# Altium PCB PCB_GTV3.3.PcbDoc (part 10 of 11)
Units mil, origin at the board's own origin, x right, y up, seen from the top; angles counter-clockwise.
Board outline 8070.87 x 4881.89 mil, 4 copper layers (Top Layer, GND, PWR, Bottom Layer), stack 61.653 mil thick; 464 components, 293 nets, 1458 pads, 748 vias.
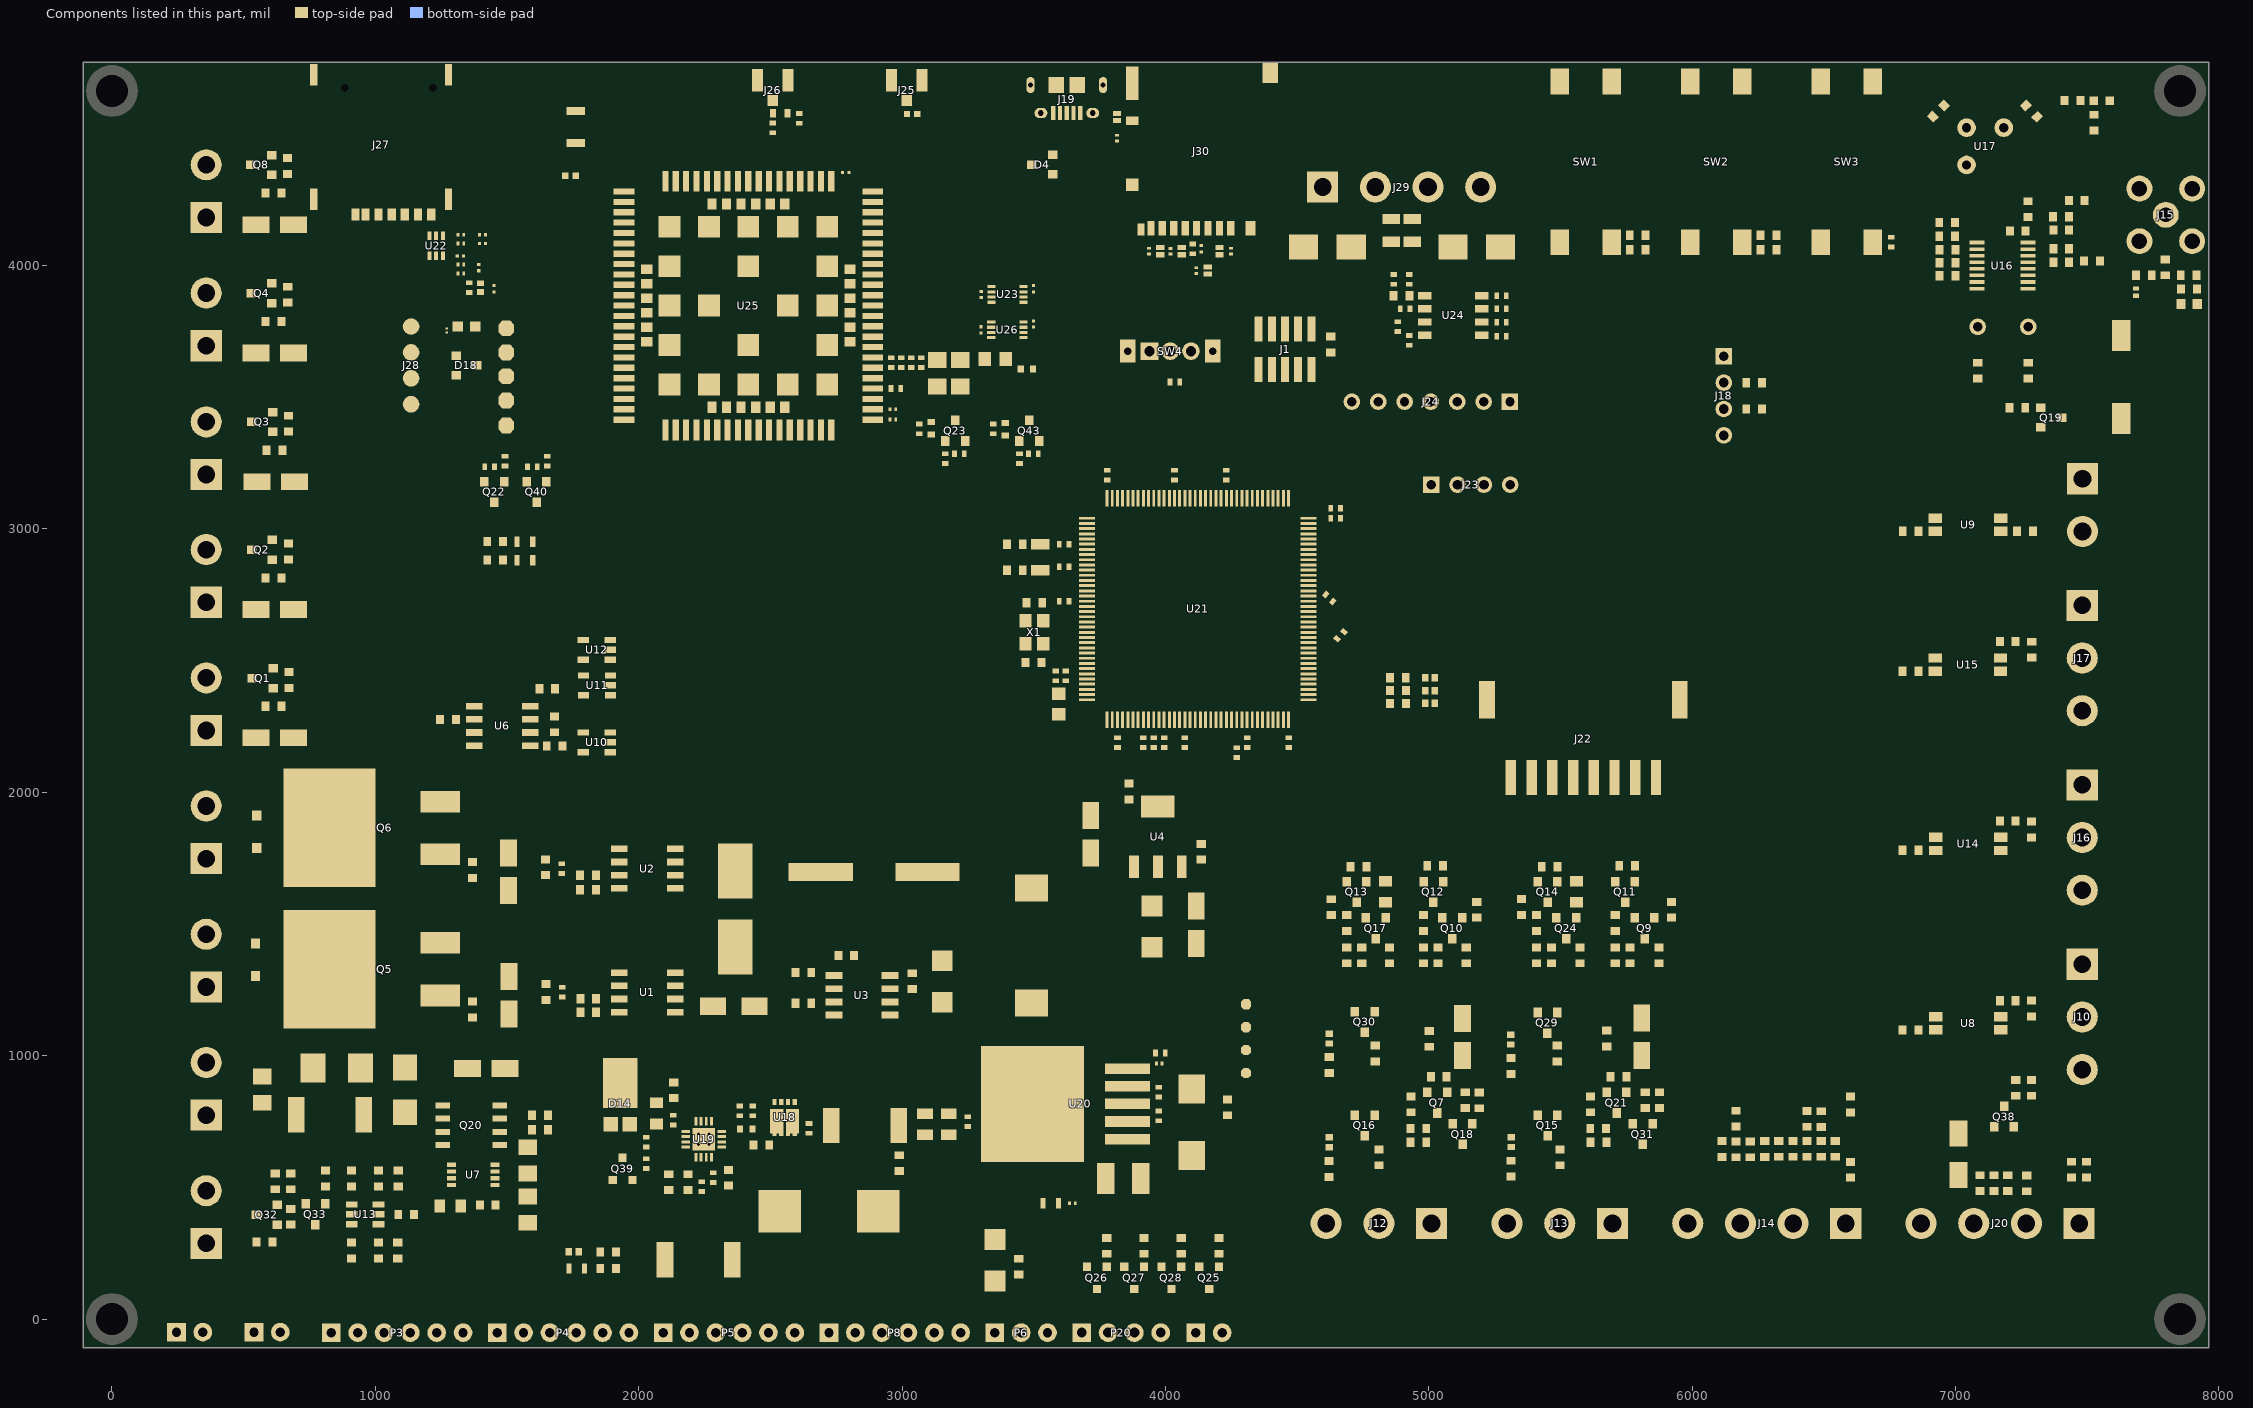
[diagram p7: the components of this part, seen from the top]

## Other copper
Top Layer:
  rectangle net VREF: 2215.07,506.67 2252.31,558.52
  rectangle net NetQ39_3: 2150.62,687.16 2193.89,698.18
  rectangle net GND: 2245.75,3806.7 2353.1,3821
  rectangle net SIM_CD: 1330.37,3962.75 1358.96,3977.32
  rectangle net SIM_RST: 1330.37,3996.75 1358.96,4011.32
  rectangle net SIM_CLK: 1330.42,4076.17 1359.01,4090.74
  rectangle net SIM_DATA: 1330.37,4109.84 1358.96,4124.41
  rectangle net GND: 752.09,4628 779.65,4765.95
  rectangle net GND: 3464.95,4639 3874.32,4718.13
  rectangle net GND: 3511.12,4654.86 3615.55,4715.88
  rectangle net GND: 1444.09,3917.91 1496.26,3929.64
  rectangle net GND: 1386.96,3937.97 1432.19,3986.32
  rectangle net GND: 1325.25,4030.94 1342.66,4056.12
  rectangle net GND: 1412.68,4042.75 1427.77,4159
  rectangle net GND: 2538.66,4475.29 2561.93,4517.87
  rectangle net GND: 2977.9,4543.19 2987.72,4585.98
  rectangle net GND: 3048.24,4543.19 3069.5,4575
  rectangle net NetC8_2: 2849.33,3639.37 2928.07,3741.74
  rectangle net GND: 2791.98,4343.66 2827,4545
  rectangle net GND: 4444.4,2161.5 4479.86,2179.5
  rectangle net GND: 5765.32,1504.03 5818.87,1541.04
  rectangle net GND: 3493.09,3917.91 3519,3949.38
  rectangle net GND: 3270.36,3761.91 3305.91,3819.42
  rectangle net VCC#12: 2213,1106 2336.8,1220.86
  rectangle net BAT: 2385.18,512.67 2435.75,630.07
  rectangle net BAT: 2373.31,475.67 2396.94,657.19
  rectangle net S_VIN: 1768.87,617.29 1900.5,767.23
  rectangle net VCC_M: 602.37,403.46 708.37,508.03
  rectangle net 5V: 7554,481 7691,612.4
  rectangle net NetLS1_2: 7384.13,3360.98 7664.3,3482.03
  rectangle net 3V3: 7384.13,3675.94 7664.3,3794.05
  rectangle net GSM_PWR: 3771,1089.97 4253.14,1215.68
  rectangle net GSM_PWR: 4030.87,819.24 4253.14,1215.68
  rectangle net 5V: 7479.48,582.4 7691,708
  rectangle net GSM_PWR: 3770.55,863.88 4150.32,904.03
  rectangle net RST_GSM: 3159.4,3379.76 3178.33,3422.25
  rectangle net GND: 3053.1,3346.83 3124.38,3370.26
  rectangle net GSM_PWR: 3290.88,3511.03 3458.65,3571.03
  rectangle net 3V3: 4268.44,2160.01 4322.38,2179.5
  rectangle net 3V3: 3545,1860.11 4035.25,1988
  rectangle net GND: 3512,2625.02 3605.86,2738.06
  rectangle net 3V3: 3494,2258.65 3623.45,2322.41
  rectangle net VDDA: 3567.02,2350.75 3618.98,2432.88
  rectangle net 3V3: 3461.3,3895.29 3499.41,3904.63
  rectangle net 3V3: 4916.87,1396.03 4997.37,1489.03
  rectangle net GND: 5595.67,1080.03 5839.86,1194.08
  rectangle net GND: 4915.17,1079.03 5159.36,1193.08
  rectangle net 3V3: 5646.65,1396.03 5725.37,1489.03
  rectangle net 3V3: 4578.87,1579.03 4647.37,1638.1
  rectangle net 3V3: 5284.87,1569.32 5369.37,1636.92
  rectangle net 3V3: 4538.91,3712.33 4645.42,3806.82
  rectangle net 3V3: 4872.81,3823.76 4900.53,3847.17
  region net VDD_EXT: 3461.3,3885.13 3420.51,3885.13 3420.51,3875.8 3461.3,3875.8
  region net VDD_EXT: 3460.89,3750.96 3420.1,3750.96 3420.1,3741.62 3460.89,3741.62
  rectangle net VDD_EXT: 2849.33,3481.2 3004.37,3506.2
  rectangle net GND: 2225.32,4105.91 2756.81,4188.59
  rectangle net 3V3: 3313.61,105.29 3577.17,184.03
  rectangle net GND: 4368.15,4627 4427.21,4718.48
  rectangle net 5V: 2974.49,1662.95 3305,1731.85
  rectangle net 5V: 3427.99,1517.59 4154.18,1636.9
  rectangle net 5V: 4043.13,1517.59 4154.18,1759.72
  rectangle net _ADC: 3903.67,2198.5 4007.41,2216.5
  rectangle net GND: 1171.52,1323.99 1321.52,1469.5
  rectangle net GND: 1171.52,1860 1321.52,2005.51
  rectangle net GND: 1410,1718.19 1958.4,1820.55
  rectangle net 5V: 1476.46,1089 1960.8,1127.76
  rectangle net 5V: 1474.5,1558 1958.85,1596.76
  rectangle net 5V: 1823.5,1089 1960.8,1183.08
  rectangle net 5V: 1822.5,1558 1958.4,1648.08
  rectangle net 5V: 1695.8,2140.64 1811.76,2193.71
  rectangle net 5V: 1430,2214.41 1483.69,2340
  rectangle net 5V: 1305.87,2264.41 1449,2290
  region net VCC: 6618.37,598.66 6618.37,646.4 6583.37,646.4 6583.37,598.66
  region net GND: 5984.03,2122.96 5764.18,2122.96 5764.18,1989.11 5984.03,1989.11
  rectangle net VCC: 5190,1989.11 5409.85,2122.96
  rectangle net VCC: 5595.67,830.31 5704.87,1050.03
  rectangle net VCC: 5595.67,949.99 5839.86,1052.35
  rectangle net VCC: 4915.17,948.99 5159.36,1051.35
  rectangle net VCC: 4915.17,830.31 5022.64,1049.03
  rectangle net VCC: 1565,810.77 1669.87,982.89
  rectangle net VCC: 1639.87,756.53 1669.87,982.89
  rectangle net VCC: 2108.01,1722.49 2260,1987.82
  rectangle net VCC: 2108.01,1253.49 2260,1517.82
  rectangle net GND: 1639.87,668.22 1669.87,736.53
  rectangle net VCC: 510,2234.57 598.32,2344.5
  rectangle net VCC: 510,2721.6 598.32,2831.53
  rectangle net VCC: 514,3206.6 602.32,3316.53
  rectangle net VCC: 510,3695.57 598.32,3805.5
  rectangle net VCC: 510,4182.57 598.32,4292.5
  rectangle net VCC: 7212.84,1192.2 7305.73,1406.12
  rectangle net VCC: 7212.84,1288.01 7540.03,1406.12
  rectangle net VCC: 7212.84,2554.87 7306.94,2768.78
  rectangle net VCC: 7212.84,2650.67 7540.03,2768.78
  rectangle net VCC: 7212.84,1969.34 7540.03,2087.45
  rectangle net VCC: 7212.84,1873.53 7305.73,2087.45
  region net NetD8_2: 5090.04,4109.92 4904.07,4109.92 4904.07,4070.55 5090.04,4070.55
  rectangle net NetD5_2: 4705.42,4070.55 4891.39,4109.92
  rectangle net NetR87_1: 4919.53,3821.73 5010.21,3849.29
  rectangle net NetR61_1: 4832.21,3771.73 4851,3938.03
  rectangle net NetR87_1: 4919.53,3823.01 4937.53,3885.51
  rectangle net NetR87_1: 4911.03,3868.01 4941.03,3938.03
  rectangle net NetR61_1: 4836,3868.01 4881.03,3938.03
  rectangle net NRST: 6649.97,4039.22 6768.37,4079.53
  rectangle net GND: 3512,2625.02 3559.24,2737.16
  rectangle net XIN: 3445.07,2625.02 3492.32,2737.16
  region net 3V3: 4606.26,2735.9 4623.94,2753.58 4610.3,2767.22 4592.63,2749.54
  region net 3V3: 4659.78,2573.84 4642.11,2591.51 4628.47,2577.88 4646.15,2560.2
  rectangle net RS_CNTRL: 576.94,4334.19 606,4357.81
  rectangle net PM_CNTRL: 577.94,3846.19 607,3869.81
  rectangle net MEM_CNTRL: 580.94,3356.19 610,3379.81
  rectangle net FLUSH_CNTRL: 579.94,2869.19 609,2892.81
  rectangle net FILL_CNTRL: 583,2383.63 612.06,2407.25
  rectangle net FILL_CNTRL: 593.95,2379.3 690.19,2411.36
  rectangle net GND: 7235.87,3980.64 7303.85,3994.42
  rectangle net GND: 7235.87,3930.64 7303.85,3944.42
  rectangle net 3V3: 7207.64,893.03 7305.73,923.03
  rectangle net VCC: 298.86,4123.51 598.32,4241.62
  rectangle net VCC: 298.86,3636.51 598.32,3754.62
  rectangle net VCC: 302.86,3147.51 602.32,3265.62
  rectangle net VCC: 298.86,2662.51 598.32,2780.62
  rectangle net VCC: 298.86,2175.51 598.32,2293.62
  rectangle net GND: 632,3147.58 775,3316.5
  rectangle net GND: 628,4123.58 833,4292.5
  rectangle net GND: 628,3636.58 774,3805.5
  rectangle net GND: 628,2662.58 740.05,2831.53
  rectangle net GND: 628,2175.58 740.05,2344.5
  rectangle net AUTO_FILL: 363.74,2399.81 551.43,2466.81
  rectangle net AUTO_FLUSH: 360.74,2887.57 548.43,2954.57
  rectangle net MEM_SAVER: 361.92,3373 549.61,3440
  rectangle net PROP_MIXING: 358.92,3862 546.61,3929
  rectangle net RESIN_SAVER: 357.92,4349 545.61,4416
  rectangle net GNSS_PWRCTRL: 3624.86,2842.88 3660.15,2868.87
  region net 3V3: 4225.23,3193.64 4225.23,3163.89 4237.04,3163.89 4237.04,3193.64
  region net 3V3: 4028.38,3193.64 4028.38,3163.89 4040.19,3163.89 4040.19,3193.64
  region net 3V3: 3772.47,3193.64 3772.47,3163.89 3784.28,3163.89 3784.28,3193.64
  rectangle net VDDA: 3567,2408.51 3733.1,2432.88
  rectangle net GND: 3570.52,2447.88 3733.1,2472.25
  rectangle net GNSS_PWRCTRL: 3624.86,2857.85 3733.1,2868.87
  rectangle net 3V3: 3625.26,2930.74 3655.01,2950.51
  rectangle net 3V3: 3625.26,2715.19 3655.01,2735.29
  rectangle net NetR16_2: 4005,3545.5 4030.49,3675.03
  rectangle net GND: 1386.75,3922.44 1455.91,3944.09
  rectangle net VDD_EXT: 1344.37,3888.98 1412.74,3910.63
  region net GND: 3335.94,3904.82 3298.47,3904.82 3298.47,3896.08 3335.94,3896.08
  region net GND: 3335.53,3770.64 3298.05,3770.64 3298.05,3761.91 3335.53,3761.91
  region net VDD_EXT: 3338.84,3750.1 3298.05,3750.1 3298.05,3741.62 3338.84,3741.62
  region net VDD_EXT: 3339.26,3884.27 3298.47,3884.27 3298.47,3875.8 3339.26,3875.8
  rectangle net 3V3: 3460.89,3761.11 3499,3770.45
  rectangle net GND: 593.95,2441.36 690.19,2486.39
  rectangle net NetL6_1: 2553.26,4568.54 2621.5,4586.54
  rectangle net 3V3: 4104.37,4084 4131.93,4127.09
  rectangle net 3V3: 4091.87,4069.67 4141.91,4095
  rectangle net GND: 4091.87,4036 4141.91,4057.86
  region net DAT0: 3993.16,4077.35 3929.41,4077.35 3929.41,4060.22 3993.16,4060.22
  rectangle net 3V3: 3929.64,4022.7 3944.21,4045.81
  rectangle net 3V3: 4011.25,4022.48 4025.82,4045.59
  region net CLK: 4075,4077.13 4011.25,4077.13 4011.25,4060 4075,4060
  region net CMD: 4174,4003.66 4109.72,4003.66 4109.72,3986.52 4174,3986.52
  rectangle net 3V3: 4109.72,3949 4124.28,3972.11
  rectangle net 3V3: 4241.02,4022.7 4255.59,4045.81
  rectangle net DAT3: 4191.84,4060.21 4255.59,4077.34
  rectangle net 3V3: 3808.72,4453 3823.28,4478.49
  rectangle net I34_MicroSD_DET: 3808.72,4489.51 3823.28,4519
  rectangle net I34_MicroSD_DET: 3800.25,4539.94 3874.06,4560.06
  rectangle net RST_GSM: 3053.1,3389.26 3217.74,3430.74
  rectangle net PWRKEY: 3334.1,3389.26 3536.14,3430.74
  rectangle net NetQ23_1: 3148.05,3273.03 3207.65,3298.03
  rectangle net GND: 3222.86,3273.03 3255.14,3352
  rectangle net NetQ23_1: 3148.05,3276.53 3180.34,3352
  region net GSM_USB_D_P: 1988.26,3796.85 1988.26,3820.48 1943.82,3820.48 1943.82,3796.85
  region net GSM_USB_D_N: 1988.26,3757.48 1988.26,3781.11 1943.82,3781.11 1943.82,3757.48
  region net SIM_DATA: 1988.26,3639.37 1988.26,3663 1943.82,3663 1943.82,3639.37
  region net SIM_CD: 1988.26,3521.26 1988.26,3544.88 1943.82,3544.88 1943.82,3521.26
  region net SIM_RST: 1988.26,3560.63 1988.26,3584.25 1943.82,3584.25 1943.82,3560.63
  region net SIM_CLK: 1988.26,3600 1988.26,3623.63 1943.82,3623.63 1943.82,3600
  region net SIM_VDD: 1988.26,3678.74 1988.26,3702.37 1943.82,3702.37 1943.82,3678.74
  region net USB_VBUS: 1988.26,3914.96 1988.26,3938.59 1943.82,3938.59 1943.82,3914.96
  region net UART_LOG_TX: 1988.26,3954.33 1988.26,3977.96 1943.82,3977.96 1943.82,3954.33
  rectangle net GNSS_ANT: 2488.44,4532.29 2528.6,4648.11
  rectangle net NetC8_2: 3099.32,3591.85 3338.12,3671.02
  rectangle net GSM_PWR: 3369.62,3511.03 3462,3671.02
  rectangle net GND: 2949.37,3556.7 3034.32,3606.01
  rectangle net GND: 2949.37,3520.57 2967.37,3616.52
  rectangle net GND: 3022.4,3511.03 3084.82,3623.62
  rectangle net GND: 3022.4,3511.03 3255.32,3571.03
  rectangle net NetC8_2: 2849.33,3639.37 3305.57,3671.03
  rectangle net GND: 2849.33,3600 3084.82,3623.62
  rectangle net VDD_EXT: 2986.37,3481.2 3004.37,3545.57
  region net NETLIGHT: 2844.26,3544.88 2844.26,3521.26 2888.7,3521.26 2888.7,3544.88
  region net 2V8: 2844.26,4253.55 2844.26,4229.92 2888.7,4229.92 2888.7,4253.55
  region net STATUS: 2844.26,4096.07 2844.26,4072.44 2888.7,4072.44 2888.7,4096.07
  rectangle net VDD_EXT: 2168.23,4276.03 2191.85,4320.48
  rectangle net RST_GSM: 2128.86,4276.03 2152.48,4320.48
  region net PWRKEY: 2743.03,4364.92 2719.41,4364.92 2719.41,4320.48 2743.03,4320.48
  region net GND: 2703.66,4364.92 2680.04,4364.92 2680.04,4320.48 2703.66,4320.48
  rectangle net USB_BOOT: 2522.56,4276.03 2546.18,4320.48
  rectangle net GSM_TX: 2404.45,4276.03 2428.07,4320.48
  rectangle net GSM_RX: 2365.08,4276.03 2388.7,4320.48
  rectangle net NetR140_1: 2849.33,3403.15 2959.36,3426.77
  rectangle net NetR135_1: 2849.33,3442.52 2959.36,3466.14
  rectangle net GND: 2849.33,3875.59 2928.07,4056.7
  rectangle net GSM_PWR: 1409.87,2864.1 1439.87,3018
  rectangle net NetLED13_1: 1468.87,2932.35 1548.18,2971.72
  rectangle net NetQ22_1: 1472.48,3161.66 1504.88,3248.53
  rectangle net GND: 1395.68,3161.52 1429.96,3248.4
  rectangle net GND: 5212.64,3957.03 5327.59,4117.79
  rectangle net SW_1: 5658.41,4039.22 5777.92,4137.65
  rectangle net GND: 4338.91,3839.88 4486.87,3906.03
  rectangle net HEATER: 4971.1,332.62 5047.78,800.51
  rectangle net NetLED5_1: 4603.73,584.92 4638.73,664.43
  rectangle net WBUS1: 4793.37,363.03 4828.37,599.03
  rectangle net IND1: 4603.73,677.55 4773.01,713.77
  rectangle net NetLED7_1: 4604.29,980.03 4639.29,1058.57
  rectangle net IND4: 4607.06,1070.77 4773.01,1106.99
  region net GND: 4717.84,1176.1 4649.2,1176.1 4649.2,1158.38 4717.84,1158.38
  region net GND: 4928.54,732.1 4897.52,732.1 4897.52,714.38 4928.54,714.38
  rectangle net GND: 4912.17,654.12 4945.17,741.12
  rectangle net HEATER: 4915.17,770.31 5047.78,800.51
  rectangle net NetQ7_1: 5052.64,843.03 5085.18,937.53
  rectangle net NetQ18_3: 5120.37,662.99 5135.37,816.31
  rectangle net RXIN1#: 4612.37,1519.03 4705.97,1549.03
  rectangle net RXIN1: 4670.97,1396.03 4705.97,1489.03
  region net GND: 4679.99,1349.4 4679.99,1318.38 4697.7,1318.38 4697.7,1349.4
  rectangle net 3V3: 4612.37,1579.03 4647.37,1625.03
  rectangle net NetQ17_3: 4657.87,1699.53 4717.87,1734.53
  rectangle net NetQ17_3: 4727.37,1396.03 4814.55,1462.3
  rectangle net GND: 4670.97,1336.03 4997.37,1366.03
  rectangle net NetQ17_1: 4833.31,1396.03 4868.31,1541.04
  region net GND: 5067.31,1541.04 5025.51,1541.04 5025.51,1504.82 5067.31,1504.82
  rectangle net WBUS1: 5017.53,1396.03 5104.71,1462.3
  rectangle net NetQ13_1: 4747.13,1643.06 4779.41,1734.53
  rectangle net WBUS1: 4810.87,1641.8 4860.87,1738.53
  rectangle net NetQ17_1: 4810.87,1504.03 4868.31,1601.8
  region net GND: 4978.21,1669.65 4947.18,1669.65 4947.18,1651.93 4978.21,1651.93
  rectangle net NetQ12_3: 4962.34,1519.03 5001.1,1600.54
  rectangle net TXIN1: 4963.69,1712.53 5008.87,1730.03
  rectangle net NetQ12_1: 5038.5,1643.06 5070.78,1738.53
  rectangle net NetQ12_3: 4962.34,1564.32 5199.37,1600.54
  rectangle net 3V3: 5284.87,1569.32 5369.37,1625.32
  rectangle net 3V3: 5333.82,1579.03 5369.37,1625.03
  region net GND: 5411.58,1669.65 5380.55,1669.65 5380.55,1651.93 5411.58,1651.93
  rectangle net NetQ24_3: 5383.87,1699.53 5443.87,1734.53
  rectangle net NetQ14_1: 5471.87,1643.06 5504.15,1734.53
  region net GND: 5705.84,1669.65 5674.81,1669.65 5674.81,1651.93 5705.84,1651.93
  rectangle net WBUS2: 5535.87,1641.8 5585.87,1734.53
  rectangle net TXIN2: 5692.69,1712.53 5737.87,1730.03
  rectangle net NetQ11_1: 5766.13,1643.06 5798.41,1738.53
  rectangle net IND2: 5298.26,677.55 5467.01,713.77
  rectangle net WBUS2: 5480.37,363.03 5515.37,599.03
  rectangle net IO_C9: 5182.93,845.31 5199.57,894.03
  rectangle net NetQ18_1: 5173.91,723.62 5208.91,815.66
  rectangle net NetLED4_1: 5294.37,585.92 5329.37,665.43
  rectangle net NetLED6_1: 5294.37,976.03 5329.37,1054.57
  rectangle net IND3: 5297.69,1067.18 5466.61,1103.4
  region net GND: 5411.43,1172.51 5348,1172.51 5348,1154.8 5411.43,1154.8
  region net GND: 5611.24,732.1 5580.21,732.1 5580.21,714.38 5611.24,714.38
  rectangle net GND: 5597.87,654.12 5628.87,741.12
  rectangle net AUX_HEATER: 5595.37,770.31 5734.78,800.51
  rectangle net AUX_HEATER: 5658.1,332.62 5734.78,800.51
  rectangle net NetQ31_3: 5804.37,662.99 5819.37,816.31
  rectangle net NetQ21_1: 5733.87,843.03 5766.41,937.53
  rectangle net NetQ10_1: 5108.47,1504.82 5199.37,1541.04
  rectangle net RXIN2#: 5334.37,1519.03 5426.37,1549.32
  region net GND: 5407.24,1358.51 5376.21,1358.51 5376.21,1340.8 5407.24,1340.8
  rectangle net RXIN2: 5391.37,1395.03 5426.37,1489.03
  rectangle net NetQ24_3: 5448.37,1396.03 5538.01,1462.3
  rectangle net GND: 5391.37,1336.03 5725.37,1366.03
  rectangle net NetQ24_1: 5535.87,1504.82 5585.87,1601.8
  rectangle net NetQ24_1: 5556.37,1396.03 5591.37,1601.8
  rectangle net NetQ11_3: 5690.37,1519.03 5728.73,1600.54
  rectangle net WBUS2: 5746.37,1396.03 5835.01,1462.3
  rectangle net NetQ11_3: 5690.37,1564.32 5938.37,1600.54
  rectangle net HEAT_CNTRL: 5867.38,846.31 5884.03,895.03
  rectangle net NetQ31_1: 5857.91,723.62 5892.91,815.66
  rectangle net NetQ9_1: 5840.13,1504.82 5938.37,1541.04
  rectangle net PWM_D2: 7167.73,790.29 7256.86,863.03
  rectangle net PS_PWR: 7409.75,303.98 7527.86,552.4
  rectangle net NetC42_1: 6095.37,599.4 6238.19,630.4
  rectangle net NetJ14_2: 6311.15,601.4 6400.48,631.4
  rectangle net NetJ14_2: 6364.87,363.03 6400.48,631.4
  rectangle net NetR112_2: 6418.37,601.4 6560.37,631.4
  rectangle net NetJ14_1: 6546.48,363.03 6620.03,552.4
  rectangle net NetR111_1: 6149.24,659.4 6184.24,746.03
  rectangle net 4-20mA: 6203.19,659.4 6346.15,691.4
  rectangle net PSW_MCU: 6977.4,471.03 7044.33,547.29
  rectangle net PSW_MCU: 7035.87,366.03 7102.87,501.03
  rectangle net PSW_MCU: 6977.4,471.03 7215.49,501.03
  rectangle net NetJ20_2: 7235.87,366.03 7302.87,501.03
  region net VCC: 7457.48,599.03 7457.48,646.76 7422.48,646.76 7422.48,599.03
  rectangle net NetR115_1: 6472.03,770.03 6618.37,805.03
  rectangle net 0-10V: 6365.48,661.4 6453.37,691.4
  rectangle net NetC79_2: 6418.37,714.03 6507.03,745.03
  rectangle net NetC79_2: 6472.03,661.4 6507.03,741.03
  rectangle net NetQ38_1: 7128.64,531.03 7163.64,747.77
  rectangle net GND: 6923.87,3943.53 6953.87,4028.2
  rectangle net SEL1: 6982.87,4042.53 7013.87,4128.53
  rectangle net RO2: 7066.43,3616.03 7101.43,3919.42
  rectangle net RO1: 7258.43,3616.03 7293.43,3919.42
  rectangle net NetQ19_1: 7249.48,3442.94 7341.61,3477.94
  rectangle net ANT: 7275.31,3955.64 7334.07,3969.42
  rectangle net ANT: 7318.87,3945.53 7699.87,3980.53
  rectangle net ANT#: 7729.87,3945.53 7869.87,3980.53
  rectangle net PATCH: 7837.83,3834.94 7873.27,3928.19
  rectangle net NetC77_2: 7899.87,3893.19 7930.87,3980.53
  rectangle net SHDN#: 7246.77,4080.64 7303.85,4199.03
  rectangle net SEL0: 7355.07,4117.75 7386.07,4202.53
  rectangle net 3V3: 7415.07,4167.53 7445.07,4264.53
  rectangle net GND: 7416.07,4046.14 7446.07,4131.75
  rectangle net 3V3#: 7416.07,3995.14 7502.87,4030.14
  rectangle net 3V3#: 7467.87,3995.14 7504.87,4265.03
  rectangle net NetJ15_1: 7778.37,4008.03 7813.37,4192.4
  rectangle net NetD17_2: 1135.6,3756.7 1332.82,3781.54
  rectangle net NetQ22_1: 1443.22,3223.4 1504.52,3248.4
  rectangle net NETLIGHT: 1479.88,3266.9 1522.87,3284.9
  rectangle net GND: 1558.43,3161.66 1590.72,3248.53
  rectangle net GND: 1266.87,3711.4 1276.32,3745.02
  rectangle net RS_CNTRL: 588.13,4328.49 684.37,4363.01
  rectangle net GND: 588.13,4393.01 684.37,4435.58
  rectangle net GND: 1263.9,4204.51 1291.46,4758.03
  rectangle net MEM_CNTRL: 592.13,3350.55 688.37,3384.77
  rectangle net GND: 592.13,3414.55 688.37,3459.58
  rectangle net VSS: 1542.98,435.4 1612.98,582.4
  rectangle net VCC#P: 1437.25,577.62 1472.89,836
  rectangle net VSS: 1437.25,526.4 1562.39,542.97
  rectangle net VCC#P: 1437.25,622.4 1612.87,791.53
  rectangle net S_VIN: 1768.87,681.53 2016.37,767.23
  rectangle net S_VIN: 1893.75,681.53 2041.37,699.53
  rectangle net NetQ39_3: 1923.07,596.87 2041.37,662.53
  rectangle net AGND: 1959.87,483.03 2041.37,580.29
  rectangle net NetQ39_3: 2016.37,607.29 2041.37,662.53
  rectangle net NetR122_1: 2096.25,534.67 2193.89,564.67
  rectangle net NetC81_2: 2161.61,712.08 2193.89,746.17
  rectangle net NetR122_1: 2176.75,534.67 2193.89,653.3
  rectangle net NetC41_2: 1863.83,800.67 2092.75,840.67
  rectangle net CRNT_VOUT.VIOUT1: 1630.78,1196.51 1793.5,1233.79
  rectangle net NetC81_2: 2042.75,720.67 2193.89,746.17
  rectangle net GND: 2115.25,756.76 2176.64,857.67
  rectangle net VCC#P: 1445.33,663.55 1500.45,836
  rectangle net VCC#P: 1436.74,749.55 1543.16,982.89
  rectangle net PM_CNTRL: 589.13,3841.49 685.37,3874.55
  rectangle net GND: 589.13,3904.55 685.37,3949.89
  rectangle net NetSB7_1: 1437.25,415.9 1471.98,509.11
  rectangle net AGND: 1959.87,158.11 2131.41,512.22
  rectangle net VREF: 2169.25,474.67 2204.25,521.67
  rectangle net NetLED12_1: 1468.87,2861.92 1548.18,2901.29
  rectangle net NetQ40_1: 1605.37,3223.53 1665.52,3248.53
  rectangle net NetQ40_1: 1633.24,3161.66 1665.52,3244.9
  rectangle net STATUS: 1639.88,3266.9 1682.87,3284.9
  rectangle net FLOW_MCU1: 6850.23,1080.21 6949.8,1115.42
  rectangle net FLOW_MCU2: 6843.44,1761.21 6949.8,1797.42
  rectangle net 3V3: 7207.64,893.03 7256.86,1016.03
  rectangle net FLOW_OUT1: 7146.65,1130.06 7480.98,1165.64
  rectangle net FLOW_OUT2: 7146.93,1811.4 7480.98,1846.4
  rectangle net NetJ18_2: 6119.98,3537.9 6219.98,3572.9
  rectangle net FLOW_MCU3: 6848.44,2442.25 6948.02,2477.47
  region net LEVEL_MCU: 6849.23,3008.64 6849.23,2973.21 6948.8,2973.21 6948.8,3008.64
  rectangle net GND: 5807.92,4039.22 6028.21,4077.9
  rectangle net NetJ18_3: 6119.98,3437.9 6219.98,3472.9
  rectangle net 3V3: 5010.86,2323.86 5088.87,2481.03
  rectangle net SW_2: 6154.19,4039.22 6274.27,4137.65
  region net NetR80_1: 7145.65,3008.64 7145.65,2973.21 7248.23,2973.21 7248.23,3008.64
  rectangle net FLOW_OUT3: 7145.87,2492.03 7480.98,2527.73
  rectangle net LEVEL_IN: 7278.23,2973.4 7481.98,3008.4
  rectangle net GND: 4870.03,3688.06 4895.03,3761.04
  region net GND: 4943.01,3668.03 4943.01,3706.06 4870.03,3706.06 4870.03,3668.03
  region net NetR61_1: 5010.21,3799.29 4836,3799.29 4836,3771.73 5010.21,3771.73
  region net 3V3: 5010.21,3749.29 4912.53,3749.29 4912.53,3721.73 5010.21,3721.73
  rectangle net 3V3: 4975.87,3694.53 5010.21,3730.03
  rectangle net RS485/RS232/T.RXD/RS485/RS232/T: 5175.57,3681.03 5266.37,3749.29
  rectangle net RE/DE/RS485/T: 5129.87,3771.73 5266.37,3849.29
  region net 3V3: 5284.59,3935.03 5284.59,3719.53 5312.15,3719.53 5312.15,3935.03
  rectangle net RS485/RS232/T.TXD/RS485/RS232/T: 5092.89,3871.73 5273.25,3899.29
  rectangle net NetQ43_1: 3429.05,3273.03 3488.65,3298.03
  rectangle net GND: 3503.86,3273.03 3536.14,3352
  rectangle net NetQ43_1: 3429.05,3276.53 3461.34,3352
  rectangle net GND: 4438.91,3677.51 4645.42,3699.92
  rectangle net GND: 4610.42,3648.03 4645.42,3699.92
  rectangle net GND: 4610.42,3648.03 5057,3677.51
  region net GND: 4368.83,3849.01 4338.91,3849.01 4338.91,3712.33 4368.83,3712.33
  region net GND: 4518.83,4117.79 4438.91,4117.79 4438.91,3684.92 4518.83,3684.92
  rectangle net VCC#M: 1228.79,713.55 1283.91,836
  rectangle net NetQ5_1: 1171.52,1187.03 1390.87,1269.5
  rectangle net NetQ6_1: 1171.52,1720 1390.87,1805.51
  rectangle net BAT: 298.86,677.03 731.41,851.03
  rectangle net GND_DRV_1: 298.86,1103.55 994.5,1320.07
  rectangle net GND_DRV_2: 298.86,1639.57 1001.45,1807.12
  rectangle net NetD6_2: 897.17,898.92 1158.14,1009.15
  rectangle net VCC#M: 924.32,699.55 1283.91,842.96
  rectangle net CRNT_VOUT.VIOUT2: 1628.78,1667.79 1792.5,1702.79
  rectangle net GND: 1410,1249.19 1959.72,1351.55
  rectangle net CRNT_SNS.IP+_1: 1356.87,1424.03 1411.87,1508.03
  rectangle net VCC: 2108.01,1253.49 2171,1329.08
  rectangle net NetR8_1: 1822.5,1667.79 1958.4,1702.79
  rectangle net NetR5_1: 1823.5,1198.79 1959.4,1233.79
  rectangle net NetLED10_2: 2211.61,582.06 2222.63,630.07
  rectangle net VREF: 2236.8,597.79 2256.49,630.07
  rectangle net BAT: 2299.4,648.79 2385.13,657.19
  rectangle net AGND: 2118.87,158.11 2295.87,458.03
  rectangle net NetC87_1: 2913.2,328.96 3007.87,576.67
  rectangle net NetC87_1: 2698.87,328.96 2938.43,576.67
  rectangle net AGND: 2226.13,435.03 2296.16,493.67
  rectangle net BAT: 2323.25,475.67 2435.75,521.67
  rectangle net AGND: 2271.16,475.67 2296.16,527.17
  rectangle net VREF: 2169.25,506.67 2246.8,521.67
  rectangle net NetR127_1: 2270.66,546.17 2358.25,581.67
  rectangle net VREF: 2241.29,506.67 2252.31,630.07
  rectangle net NetR127_1: 2270.66,566.67 2358.25,630.07
  rectangle net PH: 2480.75,429.03 2541.16,797.88
  rectangle net NetC87_1: 2699.3,508.03 2762.29,801.6
  rectangle net LED_SIG.R_CNTRL: 3759.6,183.14 3794.6,263.03
  rectangle net G_CNTRL: 3901.1,183.14 3936.1,263.03
  rectangle net NetLED11_1: 3584.55,420.35 3641.36,459.72
  rectangle net GND: 3739.34,475.1 3806.27,633.03
  rectangle net GSM_BUCK_EN: 3873.2,475.1 3940.12,675.54
  rectangle net GND: 3678.31,596.95 3806.27,633.03
  rectangle net B_CNTRL: 4042.6,183.14 4077.6,263.03
  rectangle net LED_SIG.W_LED_CNTRL: 4186.01,183.14 4221.01,263.03
  region net ADJ: 3970.72,930.81 3970.72,1022.66 3770.55,1022.66 3770.55,930.81
  rectangle net GND: 3684.62,1675.07 3899.43,1820.74
  rectangle net GND: 2922.49,1291.51 3192.24,1401.51
  rectangle net GND: 3962.23,780.66 3987.23,817.03
  rectangle net GND: 3893.48,1360.11 4154.18,1478.71
  rectangle net NetC41_2: 2558.56,694.75 2609.35,797.88
  rectangle net NetC41_2: 2558.56,734.67 2668.25,797.88
  rectangle net BAT: 2955.2,607.03 3018.2,801.6
  rectangle net GND: 3052.75,679.67 3346.87,740.17
  rectangle net GSM_BUCK_EN: 3770.55,663.09 3940.63,750.1
  rectangle net GSM_BUCK_EN: 3924.85,730.02 3987.23,761.66
  rectangle net PH: 2584.46,812.86 2600.21,853.87
  rectangle net BAT: 2955.2,759.17 3262.25,874.03
  region net GND: 3987.23,780.66 3987.23,851.91 3660.87,851.91 3660.87,780.66
  rectangle net VCC#12: 2233.03,1153.93 2331.45,1220.86
  rectangle net GSM_BUCK_EN: 2390.51,1153.93 2609.98,1269.4
  rectangle net "IPK SNS": 2639.98,1141.51 2772.88,1217.1
  rectangle net "IPK SNS": 2709.89,1141.51 2772.88,1217.1
  rectangle net "IPK SNS": 2709.89,1141.51 2985.48,1167.1
  rectangle net GSM_BUCK_EN: 2390.51,1191.51 2545.98,1517.82
  rectangle net GSM_BUCK_EN: 2390.51,1234.82 2772.88,1274.4
  rectangle net CII: 2639.98,1291.51 2772.87,1397.53
  rectangle net NetC20_2: 2922.49,1238.4 3056.37,1268.4
  rectangle net NetD1_1: 2922.49,1191.51 3180.35,1217.1
  rectangle net NetD1_1: 3113.5,1148.71 3553.97,1252.4
  rectangle net DRV_OUTB1: 1344.6,2314.41 1415.13,2340
  rectangle net FLUSH_CNTRL: 590.95,2862.99 688.19,2899.12
  rectangle net GND: 590.95,2929.12 688.19,2974.15
  rectangle net INA_1#: 1557.19,2212.89 1698.3,2242.89
  rectangle net ENA#: 1344.6,2161.21 1665.8,2191.21
  rectangle net GND: 1557.19,2264.41 1698.3,2302.89
  rectangle net GND: 1667.87,2264.41 1698.3,2410.53
  rectangle net INB_1#: 1557.19,2314.41 1637.87,2453.72
  rectangle net GND: 1895.41,1722.49 1958.4,1798.08
  rectangle net VCC: 2108.01,1722.49 2171,1798.08
  rectangle net ENA#: 1766.45,2552.87 1811.76,2590.27
  rectangle net OSC_IN: 3443,2921.62 3559.43,2961
  rectangle net 3V3: 3924.98,1675.07 4018.87,1948.03
  rectangle net GND: 3376.66,2475.81 3492.32,2592.31
  rectangle net XOUT: 3512,2475.81 3559.24,2589.59
  rectangle net OSC_OUT: 3443,2823.2 3559.43,2862.57
  rectangle net VOUT_A: 209.69,-85.97 381.87,-14
  rectangle net VOUT_B: 503.69,-86.86 674.55,-14
  region net VCC#12: 566.51,568.03 530.29,568.03 530.29,275.53 566.51,275.53
  region net NetQ32_1: 788.78,376.37 609.03,376.37 609.03,340.15 788.78,340.15
  region net IN+: 931.87,372.44 887.77,372.44 887.77,275.46 931.87,275.46
  rectangle net IN-: 990.14,275.46 1034.23,372.44
  region net IN-: 1102.87,305.46 990.14,305.46 990.14,275.46 1102.87,275.46
  region net VCC_M: 1104.64,409.84 990.14,409.84 990.14,384.03 1104.64,384.03
  rectangle net SHDN: 1303.98,404.4 1411.98,454.4
  rectangle net VCC#12: 530.29,527.96 637.37,593.31
  rectangle net VCC#P: 661.37,528.07 737.49,593.31
  rectangle net GND: 719.1,418.61 766.67,455.11
  region net NetQ33_1: 828.54,518.96 793.54,518.96 793.54,418.89 828.54,418.89
  region net VOUT_A: 931.87,518.96 851.87,518.96 851.87,422.83 931.87,422.83
  region net VOUT_B: 1034.23,518.96 951.87,518.96 951.87,422.83 1034.23,422.83
  region net VCC_M: 1104.64,518.96 1069.64,518.96 1069.64,379.96 1104.64,379.96
  rectangle net VCC#M: 1158.14,541.03 1200.87,721.99
  rectangle net VCC#M: 1158.14,541.03 1243.98,568.56
  rectangle net VCC#M: 1223.98,422.4 1263.98,568.56
  rectangle net VCC#M: 1226.98,552.03 1306.46,568.56
  rectangle net VCC#M: 1228.79,500.84 1306.46,517.38
  rectangle net GATE: 1271.46,585.88 1306.46,671.99
  region: 7959.39,4720.36 7959.39,4590.18 cw(c7954.38,4590.18) 7956.63,4585.7 cw(c7952.24,4587.9) 7956.16,4584.95 cw(c7850.37,4664.02) 7718.29,4664.02 cw(c7850.37,4664.02) 7770.45,4769.18 cw(c7773.49,4765.2) 7773.49,4770.2 7959.39,4770.2
  region: 7909.44,-107.28 7779.26,-107.28 cw(c7779.26,-102.27) 7774.78,-104.52 cw(c7776.98,-100.13) 7774.03,-104.06 cw(c7853.1,1.73) 7853.1,133.81 cw(c7853.1,1.73) 7958.26,81.65 cw(c7954.28,78.62) 7959.28,78.62 7959.28,-107.28
  region: -57.23,4770.31 72.95,4770.31 cw(c72.95,4765.3) 77.43,4767.55 cw(c75.23,4763.16) 78.18,4767.08 cw(c-0.89,4661.29) -0.9,4529.22 cw(c-0.9,4661.29) -106.05,4581.38 cw(c-102.07,4584.41) -107.07,4584.41 -107.07,4770.31
  region: -107.18,-57.33 -107.18,72.85 cw(c-102.17,72.85) -104.42,77.33 cw(c-100.03,75.13) -103.95,78.08 cw(c1.84,-1) 133.91,-1 cw(c1.84,-1) 81.75,-106.16 cw(c78.72,-102.17) 78.72,-107.18 -107.18,-107.18
  pour cut-out: 1638.16,664.41 1638.16,700.38 1672.38,700.38 1672.38,664.41
  pour cut-out: 2360.5,1057 2360.5,1134.06 2390.51,1134.06 2390.51,1057
  pour cut-out: 1126.41,520.64 1126.41,526.44 1156.82,526.44 1156.82,520.64
  pour cut-out: 699.36,870.99 699.36,878.92 716.07,878.92 716.07,870.99
  pour cut-out: 1411.26,1193.52 1411.26,1229.49 1456.01,1229.49 1456.01,1193.52
  pour cut-out: 632.12,1573.55 632.12,1620 666.34,1620 666.34,1573.55
  pour cut-out: 1109.37,4256.98 1109.37,4266.95 1124.99,4266.95 1124.99,4256.98
  pour cut-out: 1195.16,2258.05 1195.16,2294.02 1229.38,2294.02 1229.38,2258.05
  pour cut-out: 6146.29,3907.01 6146.29,3942.99 6180.51,3942.99 6180.51,3907.01
Bottom Layer:
  rectangle net AGND: 2207.88,644.11 2287.9,722.94
  rectangle net VCC: 298.86,2175.51 416.97,2293.62
  region net VOUT_B: 503.69,-13.54 503.69,-84.86 674.55,-84.86 674.55,-13.54
  region net VOUT_A: 209.69,-13.54 209.69,-84.86 380.55,-84.86 380.55,-13.54
  rectangle net AGND: 2009.33,447.03 2092.75,521.49
  region: 7959.39,4720.35 7959.39,4590.18 cw(c7954.37,4590.18) 7956.63,4585.7 cw(c7952.21,4587.91) 7956.16,4584.95 cw(c7850.37,4664.02) 7718.29,4664.02 cw(c7850.37,4664.02) 7770.45,4769.18 cw(c7773.49,4765.19) 7773.49,4770.2 7959.39,4770.2
  region: 7909.43,-107.28 7779.26,-107.28 cw(c7779.26,-102.27) 7774.78,-104.52 cw(c7776.99,-100.11) 7774.03,-104.06 cw(c7853.1,1.73) 7853.1,133.81 cw(c7853.1,1.73) 7958.26,81.65 cw(c7954.27,78.62) 7959.28,78.62 7959.28,-107.28
  region: -57.22,4770.31 72.95,4770.31 cw(c72.95,4765.3) 77.43,4767.55 cw(c75.22,4763.13) 78.18,4767.08 cw(c-0.89,4661.29) -0.9,4529.22 cw(c-0.9,4661.29) -106.05,4581.38 cw(c-102.06,4584.41) -107.07,4584.41 -107.07,4770.31
  region: -107.18,-57.33 -107.18,72.85 cw(c-102.17,72.85) -104.42,77.33 cw(c-100,75.11) -103.95,78.08 cw(c1.84,-1) 133.91,-1 cw(c1.84,-1) 81.75,-106.16 cw(c78.72,-102.17) 78.72,-107.18 -107.18,-107.18
  pour cut-out: 1093.68,4245.22 1093.68,4267.51 1139.68,4267.51 1139.68,4245.22
  pour cut-out: 4426.69,2153.18 4426.69,2189.16 4460.91,2189.16 4460.91,2153.18
  pour cut-out: 2335.16,703.72 2335.16,739.69 2369.38,739.69 2369.38,703.72
  pour cut-out: 2297.83,773.35 2297.83,809.33 2332.05,809.33 2332.05,773.35
  pour cut-out: 2138.18,783.08 2138.18,819.05 2172.4,819.05 2172.4,783.08
  pour cut-out: 2506.29,900.68 2506.29,936.66 2540.51,936.66 2540.51,900.68
  pour cut-out: 4631.49,1150.19 4631.49,1186.17 4665.71,1186.17 4665.71,1150.19
  pour cut-out: 1381.25,3857.79 1381.25,3912.92 1415.47,3912.92 1415.47,3857.79
  pour cut-out: 2607.29,4108 2607.29,4179 2686,4179 2686,4108
  pour cut-out: 1502.29,3305.68 1502.29,3341.66 1536.51,3341.66 1536.51,3305.68
  pour cut-out: 3731.91,2981.35 3731.91,3017.33 3824,3017.33 3824,2981.35
  pour cut-out: 5017.32,1512.08 5017.32,1548.05 5051.54,1548.05 5051.54,1512.08
  pour cut-out: 4929.47,1643.74 4929.47,1679.71 4963.69,1679.71 4963.69,1643.74
GND (plane layer: these items are gaps in the copper):
  lines w10: -109.33,-98.43 0.1,-98.43 0.1,-0.1 -109.33,-0.1 -109.33,-98.43 ; -109.33,4663.13 0.1,4663.13 0.1,4772.46 -109.33,4772.46 -109.33,4663.13 ; 7852.11,-98.53 7961.54,-98.53 7961.54,-0.1 7852.11,-0.1 7852.11,-98.53 ; 7852.1,4663.13 7950.63,4663.13 7950.63,4772.46 7852.1,4772.46 7852.1,4663.13
PWR (plane layer: these items are gaps in the copper):
  lines w10: -109.33,-109.43 0.1,-109.43 0.1,-0.1 -109.33,-0.1 -109.33,-109.43 ; -109.33,4663.13 0.1,4663.13 0.1,4772.46 -109.33,4772.46 -109.33,4663.13 ; 7852.11,-109.43 7961.54,-109.43 7961.54,-0.1 7852.11,-0.1 7852.11,-109.43 ; 7852.1,4663.13 7961.54,4663.13 7961.54,4772.46 7852.1,4772.46 7852.1,4663.13
  lines w25: 735.11,-102.18 735.11,78.9 788.45,132.24 2609.53,132.24 2627.24,132.24 2768.03,273.03 3551.99,273.03 3609,216.03 3609,-109.43 ; 924.53,3899.47 924.53,4305.53 ; 924.53,3908.22 924.53,3368.47 969,3324 1922.12,3324 2345.23,3324 2428.02,3324 2469.17,3324 2538.04,3392.87 3114.61,3392.87 ; 924.53,4276 924.53,4393.53 957,4426 1826.47,4426 1866.19,4386.28 1866.19,4174.87 1905.63,4135.44 2086.06,4135.44 2126,4175.37 2126,4315.18 2153.85,4343.03 2264.36,4343.03 2287,4320.4 2287,4038.91 2326.91,3999 2843.99,3999 2879.38,3963.62 2879.38,3843.62 2903.58,3819.42 3124.81,3819.42 3151,3845.61 3151,3961.66 3186.42,3997.08 3458.34,3997.08 3462,4000.74 ; 2795,1513 2795,2859.99 2724.23,2930.76 1384.3,2930.76 1355,2960.07 1355,3086 1384,3115 3075.99,3115 3114.61,3153.62 3114.61,3371.24 3114.61,3393.61 3154,3433 3154,3637.96 3179.96,3663.92 3462,3663.92 ; 4526.87,921.97 4526.87,904.13 4552,879 4789,879 4818,908 4818,1336.22 4848.78,1367 4963.94,1367 4983.87,1386.94 4983.87,1539.39 4965.46,1557.8 4466.2,1557.8 4435,1589 4435,1662.9 4435,2139.98 4470.02,2175 5107,2175 5563,2175 5607,2131 5607,1409 5635,1381 5809.42,1381 5853,1337.42 5853,979 5793,919 5574,919 5520.91,972.09 5520.91,1229.85 5486.76,1264 5164.91,1264 5132.16,1231.26 5132.16,714.01 5193.17,653 5929,653 6139.03,863.03 7315.23,863.03 7356,903.81 7356,1159 7315,1200 6450,1200 6395,1255 6395,1614 6446,1665 6963.87,1665 7028,1729.13 7028,3384.37 7064.63,3421 7462.12,3421 7501,3459.88 7501,3882 7462,3921 7359,3921 7329,3951 7329,4177.33 ; 6211.44,3258.22 6211.44,3754.49 6188.94,3777 6044.47,3777 6019.38,3751.91 6019.38,3330.61 5978.77,3290 5019,3290 4904.62,3404.38 4459.97,3404.38 4424,3440.34 4424,3826.06 4382.06,3868 3821.91,3868 3775,3914.91 3775,4340.41 3747.41,4368 3670.65,4368 3642,4339.35 3642,3800.67 3687.67,3755 4258.25,3755 4299.61,3713.63 4299.61,3258.39 4358,3200 4623.36,3200 4760.35,3200 4911.35,3049 6161.33,3049 6211.44,3099.12 6211.44,3266.84 ; 6636.22,4213 7081.37,4213 7117,4248.63 7117,4573 7141,4597 7303.27,4597 7329,4571.27 7329,4167.73 ; 6649,4213 5352,4213 5281.54,4142.54 4464.46,4142.54 4428,4179 4428,4464 4386,4506 3501.45,4506 3462,4466.55 3462,2921.1 3405,2864.1 3066.99,2864.1 3004,2801.11 3004,1792 3047.2,1748.8 3066.2,1748.8 3156,1748.8 ; 3156,1748.8 3190.55,1783.35 4117.96,1783.35 4144.85,1756.46 4144.85,1191.23 4184.7,1151.38 4467.62,1151.38 4526.87,1092.13 4526.87,900.55 4488,861.68 4488,272.75 4520.75,240 7528.51,240 7569,280.49 7569,678.68 7586.32,696 7658.83,696 7676,678.83 7676,237 7575.85,136.85 4501.15,136.85 4381.75,136.85 4351,167.6 4351,696 4322,725 2842,725 2808,759 2808,923 2771.84,959.16 1841.74,959.16 1812,988.91 1812,1180 1812,2094 1772,2134 1400.04,2134 1370.16,2163.88 1370.16,2604.63 1402.66,2637.14 1950.73,2637.14 1987,2600.87 1987,1269 2014.49,1241.51 2732.51,1241.51 2760.25,1269.25 2760.25,1477.25 2796,1513 3002,1513 3030,1485 3030,1108 3078,1060 3310,1060 3900,1060 3933,1093 3933,1231 3904,1260 3401.6,1260 3365,1296.6 3365,1570.69 3333.92,1601.78 3188.13,1601.78 3156,1633.91 3156,1748.8 ; 218,1372.51 218,1554.22 256.3,1592.51 858.49,1592.51 925,1526 1493,1526 1522.76,1496.24 1522.76,1209.67 1494.09,1181 1096,1181 938,1339 251.51,1339 218,1372.51 ; 218,1859.56 251.51,1826.05 938,1826.05 1096,1668.05 1494.09,1668.05 1522.76,1696.73 1522.76,1983.29 1493,2013.05 925,2013.05 858.49,2079.57 256.3,2079.57 218,2041.27 218,1859.56 ; 255,213.09 280.92,187.17 511.17,187.17 567,243 1963,243 1991,271 1991,751.35 1962.35,780 1745.52,780 1721,755.48 1721,474 1701.4,454.4 1208.4,454.4 1078.64,324.64 764.92,324.64 701.86,387.7 276.7,387.7 255,366 255,213.09 ; 748,529.83 748,597.94 759.56,609.5 782.02,609.5 978.5,609.5 991.18,596.82 991.18,531.32 978.14,518.27 759.56,518.27 748,529.83

## Silkscreen, mask and mechanical layers (free items; w line width, h text height)
Top Overlay:
  drawing of 158 lines, arcs and shapes, not listed
  text "ULTRA-SONIC" at 4463.87,4691.31 h85
  text "MOTION DETETCTION" at 6929.98,4664.4 h55
  text "PHOTO TRANSISTOR" at 7347.87,4663.03 h55
  text "BLUETOOTH / ANTENNA" at 1965.58,4630.47 h65
  text "GNSS / ANTENNA" at 2596.58,4630.47 h65
  text "MAIN / ANTENNA" at 3106.43,4630.47 h65
  text "NANO-SIM / JACK" at 432.87,4628.95 h65
  text "RESIN SAVER" at -108.56,4515.56 h65 r270
  text "USB" at 3483.51,4454.4 h65
  text "RF / ANTENNA" at 7636.58,4357.47 h65
  text "-ve" at 488.12,4312.4 h80 r90
  text "*" at 6891.49,4202.11 h60
  text "&" at 1333.25,4153.96 h60
  text "+ve" at 4499.87,4153.71 h80
  text "-ve" at 5099.87,4153.71 h80
  text "SD SLOT" at 3517,4131 h85
  text "&" at 1032.25,4095.96 h60
  text "+ve" at 488.11,4092.4 h80 r90
  text "PROP MIXING" at -108.56,4028.56 h75 r270
  text "#MEM" at 3743.62,3947.78 h60
  text "SWITCH 1" at 5433.87,3948.03 h65
  text "SWITCH 2" at 5932.65,3948.03 h65
  text "RESET" at 6465.72,3948.03 h65
  text "*" at 6626.49,3856.11 h60
  text "-ve" at 488.12,3825.4 h80 r90
  text "SOFTWARE" at 4282,3817 h65
  text "BOOT0 SWITCH" at 3848.2,3766.36 h65
  text "BOOT" at 1539.87,3737.43 h60
  text "VBUS" at 1539.87,3646.04 h60
  text "+ve" at 488.11,3605.4 h80 r90
  text "USB N" at 1539.87,3551.31 h60
  text "MEM SAVER" at -108.56,3539.56 h75 r270
  text "USB P" at 1539.87,3458.43 h60
  text "NFC" at 5383.87,3452.03 h65
  text "BUZZER" at 7954.23,3428.03 h55 r90
  text "TX" at 1539.87,3369 h60
  text "NEAR FIELD COM" at 4657.53,3356.03 h65
  text "-ve" at 488.12,3336.4 h80 r90
  text "FS10000A  / RX MODULE" at 5801.87,3295.03 h65 r90
  text "+ve" at 489,3120 h80 r90
  text "+ve" at 7400.61,3115.22 h80 r90
  text "#MEM" at 2436.62,3077.78 h60
  text "AUTO FLUSH" at -108.56,3054.56 h75 r270
  text "ENCODER" at 4957.98,3038 h65
  text "#" at 3578.64,2983.78 h60
  text "#" at 3002.64,2975.78 h60
  text "NET-LIGHT" at 1647.37,2918.69 h65
  text "-ve" at 7400.61,2911.22 h80 r90
  text "LEVEL SENSOR" at 7954.23,2857.4 h65 r90
  text "-ve" at 488.12,2851.4 h80 r90
  text "STATUS" at 1647.37,2842.03 h65
  text "+ve" at 488.11,2631.4 h80 r90
  text "+ve" at 7399.61,2630.56 h80 r90
  text "AUTO FILL" at -108.56,2567.56 h85 r270
  text "$" at 3520.19,2407.95 h60
  text "DATA" at 7398.61,2407.56 h80 r90
  text "-ve" at 488.12,2364.4 h80 r90
  text "$" at 3315.19,2309.95 h60
  text "-ve" at 7399.61,2230.56 h80 r90
  text "FLOW METER-3" at 7954.23,2182.06 h85 r90
  text "+ve" at 488.11,2144.4 h80 r90
  text "PUMP-2" at -108.56,2081.06 h85 r270
  text "+ve" at 7399.61,1949.22 h80 r90
  text "HMI DISPLAY" at 5263.96,1895.89 h85
  text "+ve" at 488.11,1877.9 h80 r90
  text "DATA" at 7398.61,1726.22 h80 r90
  text "-ve" at 488.12,1677.9 h80 r90
  text "PUMP-1" at -108.56,1594.01 h85 r270
  text "-ve" at 7399.61,1549.22 h80 r90
  text "FLOW METER-2" at 7954.23,1499.73 h85 r90
  text "+ve" at 493.12,1390.47 h80 r90
  text "+ve" at 7399.61,1267.89 h80 r90
  text "-ve" at 488.12,1190.47 h80 r90
  text "3V3" at 4339,1165 h80
  text "BATTERY" at -107.98,1106.01 h85 r270
  text "5V" at 4339,1077 h80
  text "DATA" at 7399.61,1044.89 h80 r90
  text "3V8" at 4339,990 h80
  text "-ve" at 489.12,908.57 h80 r90
  text "GND" at 4339,902 h80
  text "-ve" at 7399.61,867.89 h80 r90
  text "FLOW METER-1" at 7954.23,818.4 h85 r90
  text "+ve" at 489.11,703.95 h80 r90
  text "SOLAR" at -107.98,619.11 h85 r270
  text "DATA" at 4707.98,445.4 h80
  text "DATA" at 5394.98,445.4 h80
  text "-ve" at 4530.98,444.4 h80
  text "+ve" at 4930.98,444.4 h80
  text "-ve" at 5217.98,444.4 h80
  text "+ve" at 5617.98,444.4 h80
  text "-ve" at 5903.81,444.4 h80
  text "+ve" at 6516.48,444.4 h80
  text "-ve" at 6789.63,444.4 h80
  text "+ve" at 7389.31,444.4 h80
  text "-ve" at 489.12,421.67 h80 r90
  text "GSM / POWER" at 3232.87,384.03 h65
  text "CHARGING" at 1356.87,230.03 h65
  text "+ve" at 489.11,217.05 h80 r90
  text "FULL" at 1524.37,147.15 h65
  text "6" at 3209,17 h35
  text "1" at 827.29,13.4 h35
  text "6" at 1321.46,13.4 h35
  text "1" at 1457.04,13.4 h35
  text "6" at 1951.21,13.4 h35
  text "1" at 2086.79,13.4 h35
  text "6" at 2580.96,13.4 h35
  text "1" at 2716.54,13.4 h35
  text "VOUT-A" at 187.12,5.57 h60
  text "VOUT-B" at 480.12,5.57 h60
  text "TDS-1" at 868.55,1.18 h85
  text "TDS-2" at 1498.3,1.18 h85
  text "TDS-3" at 2128.05,1.18 h85
  text "TDS-4" at 2786.94,1.18 h85
  text "DS18B20" at 3300.12,1.18 h75
  text "RGB LED" at 3630.12,1.18 h85
  text "W-LED" at 4047.12,1.18 h75
  text "MAIN-HEATER" at 4476.98,-104.45 h85
  text "AUX-HEATER" at 5164.98,-104.45 h85
  text "PRESSURE SENSOR" at 5850.98,-104.45 h85
  text "PRESSURE SWITCH" at 6736.81,-104.45 h85
Bottom Overlay:
  drawing of 16 lines, arcs and shapes, not listed
  text "v3.3 PCB BOARD" at 6839.68,18 h120
Board Outline:
  the board outline again, w10
Fabrication:
  drawing of 295 lines, arcs and shapes, not listed
  text "Layer" at 10026.74,1611 h60
  text "Name" at 10436.65,1611 h60
  text "Material" at 11366.4,1611 h60
  text "Thickness" at 12226.16,1611 h60
  text "Constant" at 12876,1611 h60
  text "Board Layer Stack" at 13445.86,1611 h60
  text "Top Overlay" at 10436.65,1491 h60
  text "Top Solder" at 10436.65,1371 h60
  text "Solder Resist" at 11366.4,1371 h60
  text "0.71mil" at 12226.16,1371 h60
  text "3.5" at 12876,1371 h60
  text "1" at 10026.74,1251 h60
  text "Top Layer" at 10436.65,1251 h60
  text "1.38mil" at 12226.16,1251 h60
  text "Dielectric 2" at 10436.65,1131 h60
  text "PP-006" at 11366.4,1131 h60
  text "7.99mil" at 12226.16,1131 h60
  text "4.4" at 12876,1131 h60
  text "2" at 10026.74,1011 h60
  text "GND" at 10436.65,1011 h60
  text "CF-004" at 11366.4,1011 h60
  text "1.18mil" at 12226.16,1011 h60
  text "Dielectric 1" at 10436.65,891 h60
  text "FR-4" at 11366.4,891 h60
  text "40.55mil" at 12226.16,891 h60
  text "4.6" at 12876,891 h60
  text "3" at 10026.74,771 h60
  text "PWR" at 10436.65,771 h60
  text "CF-004" at 11366.4,771 h60
  text "1.18mil" at 12226.16,771 h60
  text "Dielectric 3" at 10436.65,651 h60
  text "PP-006" at 11366.4,651 h60
  text "7.99mil" at 12226.16,651 h60
  text "4.4" at 12876,651 h60
  text "4" at 10026.74,531 h60
  text "Bottom Layer" at 10436.65,531 h60
  text "1.38mil" at 12226.16,531 h60
  text "Bottom Solder" at 10436.65,411 h60
  text "Solder Resist" at 11366.4,411 h60
  text "0.71mil" at 12226.16,411 h60
  text "3.5" at 12876,411 h60
  text "Bottom Overlay" at 10436.65,291 h60
  text "Total board thickness:" at 10026.74,171 h60
  text "63.07mil" at 12226.16,171 h60
  text "Note:" at -33.02,-559.79 h55
  text "J18 is the header placed for FS10000A Receiver Module and it should be mounted on board with an offset of atleast 3mm from the surface of PCB." at -50.02,-765.45 h55